# Altium PCB DT10966_MOTOR_CONTROLLER.PcbDoc (part 1 of 8)
Units mm, origin at the board's own origin, x right, y up, seen from the top; angles counter-clockwise.
Board outline 300 x 19 mm, 10 copper layers (Top Layer, Layer 2 GND, Layer 3 SIG, Layer 4 GND, Layer 5 PWR, Layer 6 PWR, Layer 7 GND, Layer 8 SIG, Layer 9 GND, Bottom Layer), stack 2.418 mm thick; 745 components, 446 nets, 2132 pads, 1222 vias.
Unrouted connection lines stored in the file: 3.
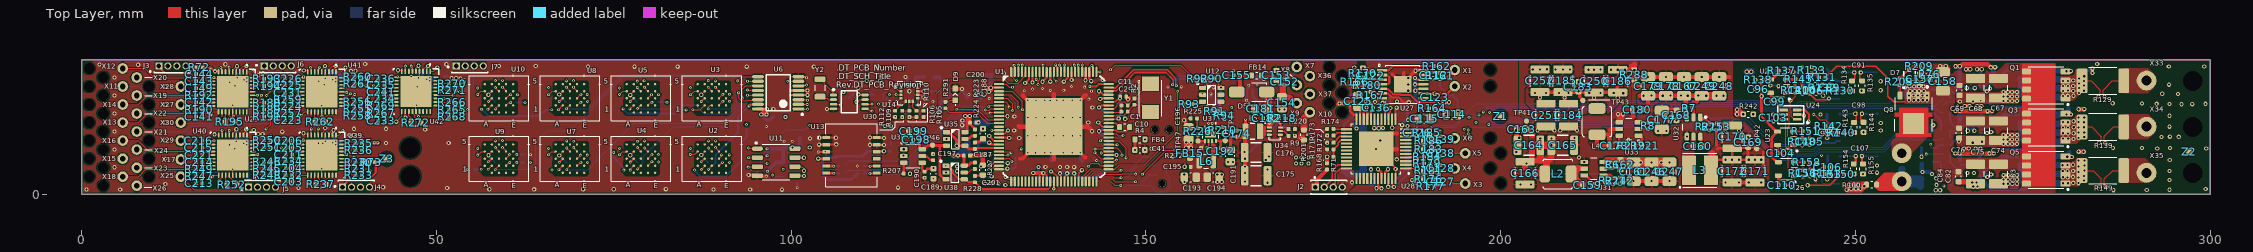
[diagram p0: Top Layer view]
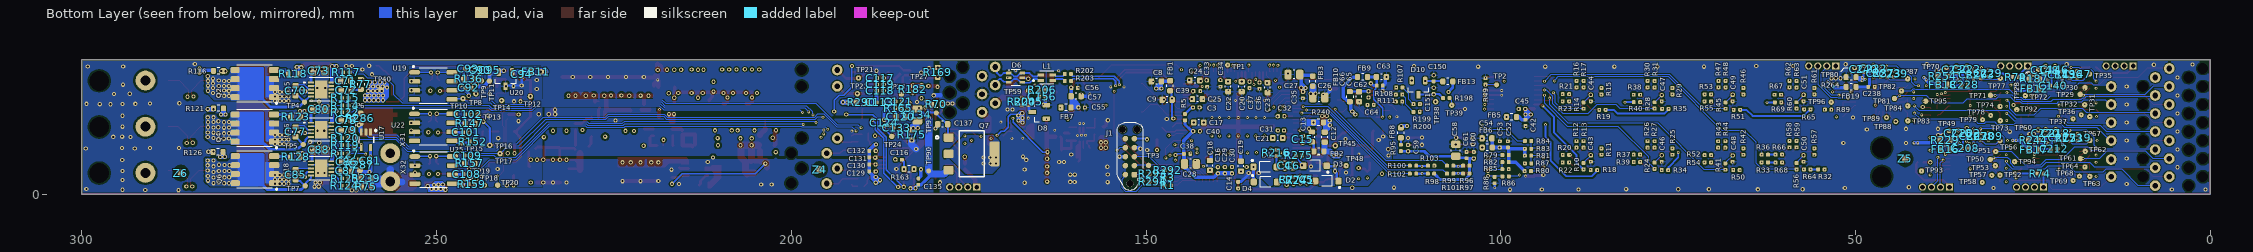
[diagram p1: Bottom Layer view, seen from below]
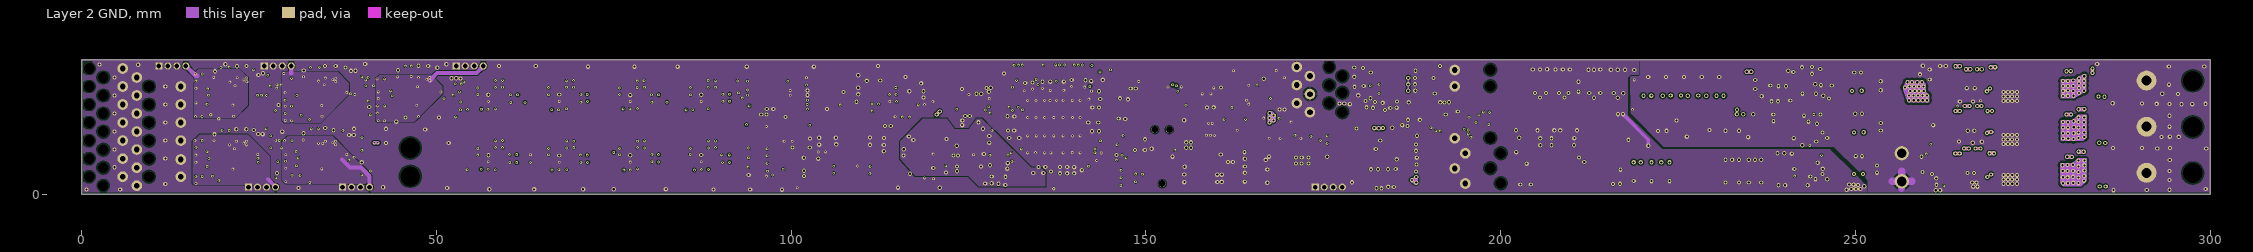
[diagram p2: Layer 2 GND]
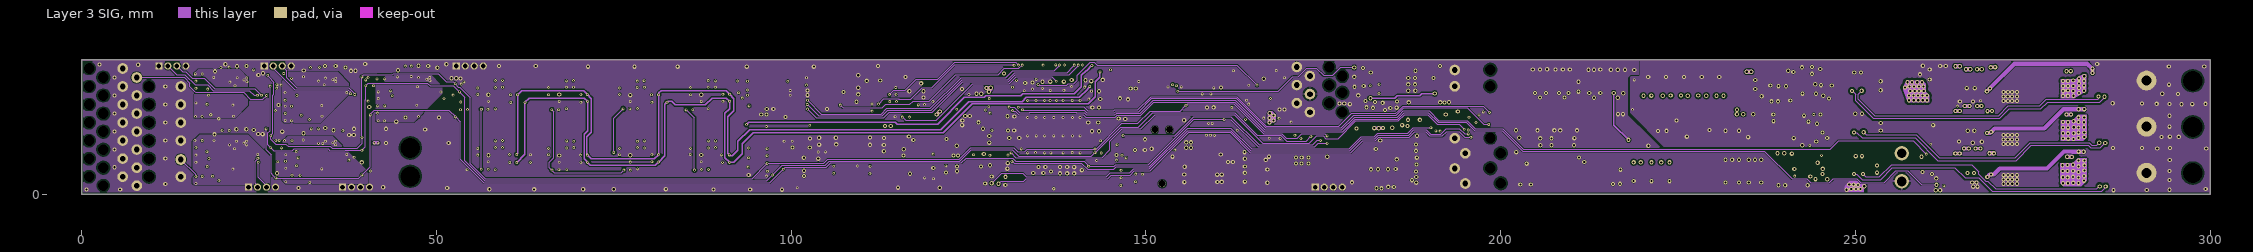
[diagram p3: Layer 3 SIG]
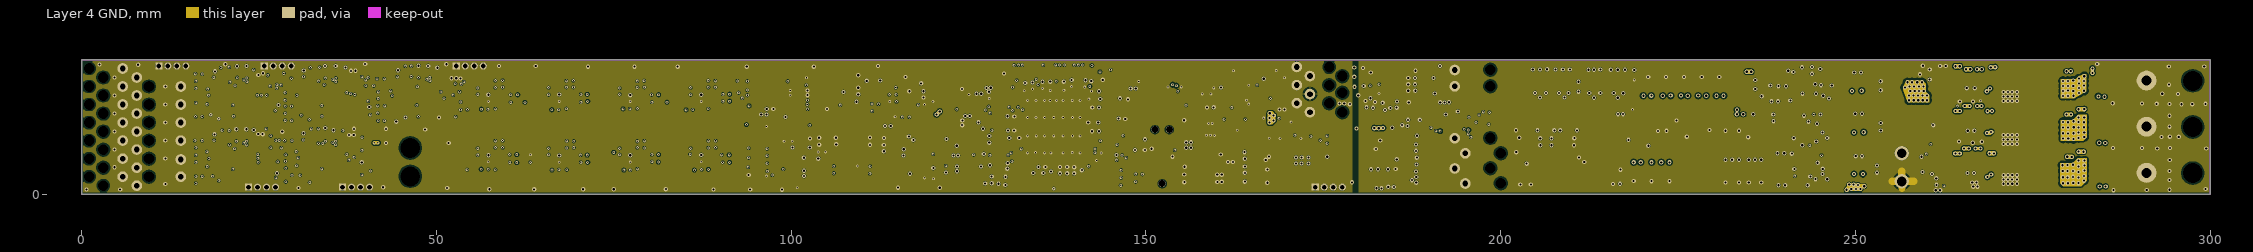
[diagram p4: Layer 4 GND]
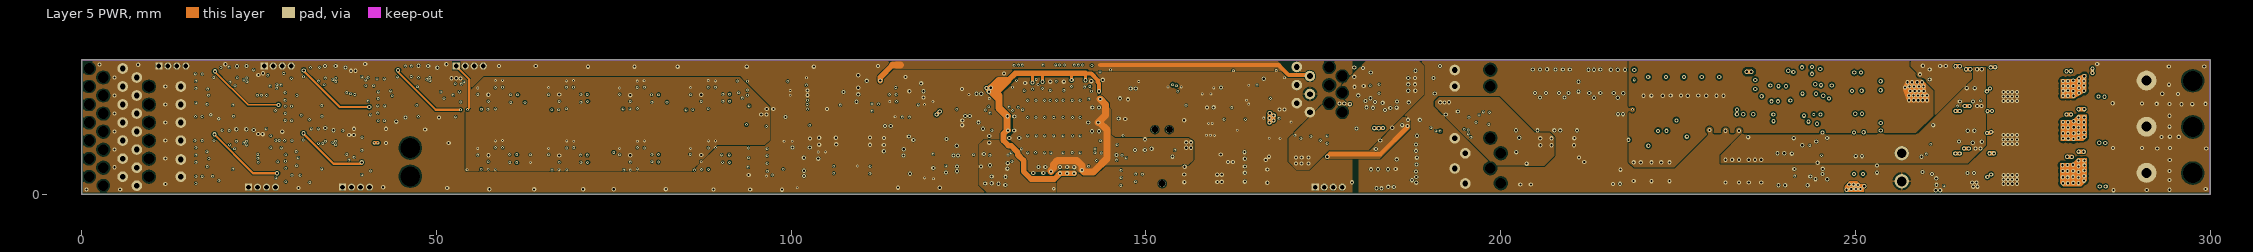
[diagram p5: Layer 5 PWR]
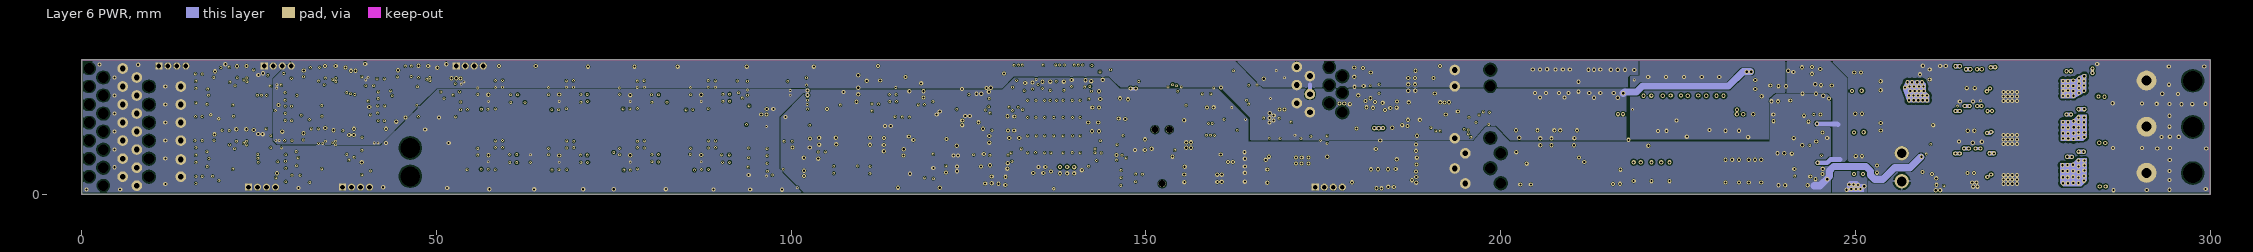
[diagram p6: Layer 6 PWR]
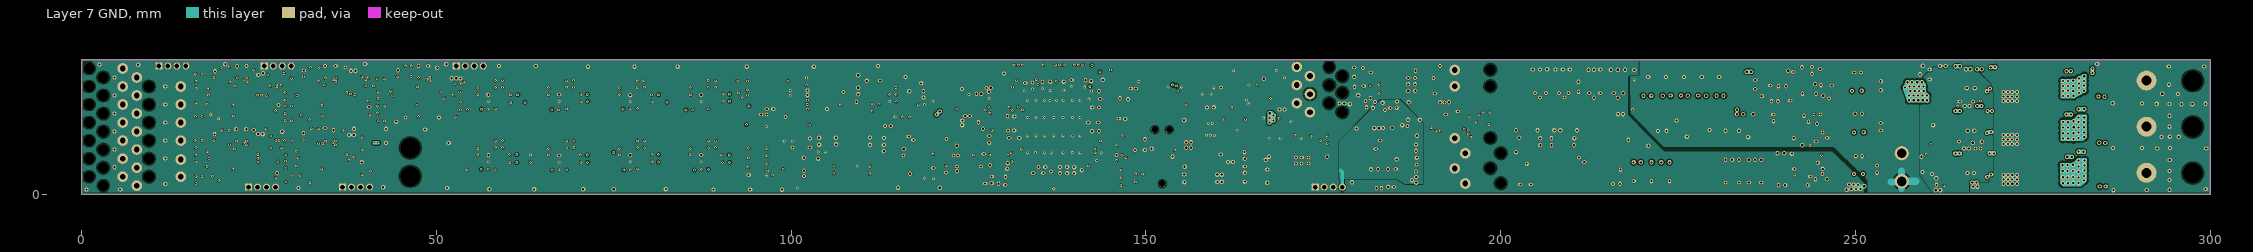
[diagram p7: Layer 7 GND]
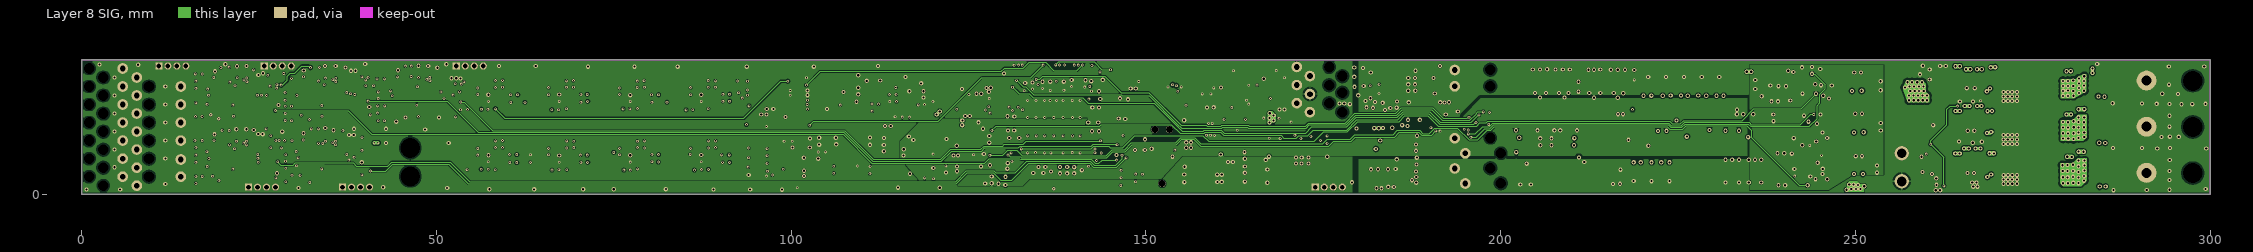
[diagram p8: Layer 8 SIG]
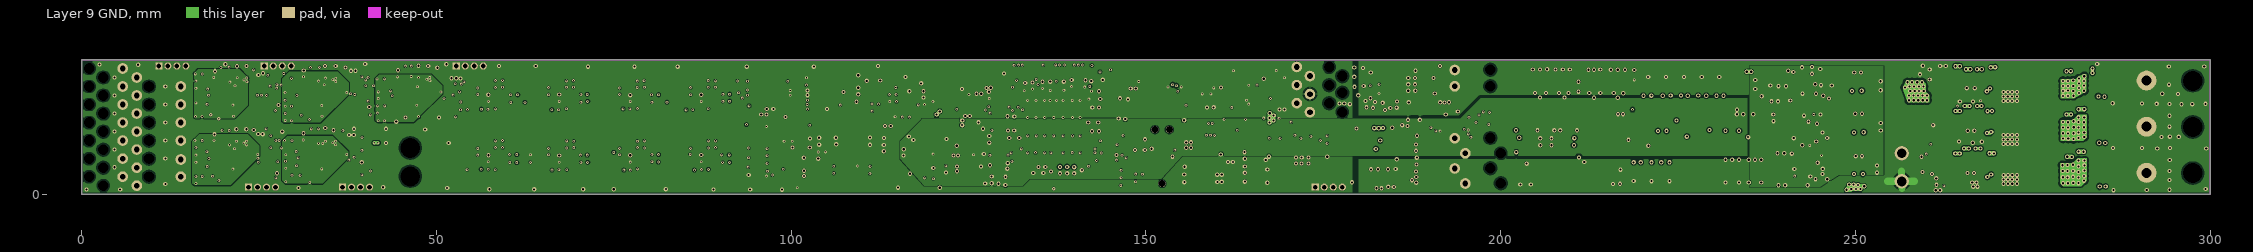
[diagram p9: Layer 9 GND]
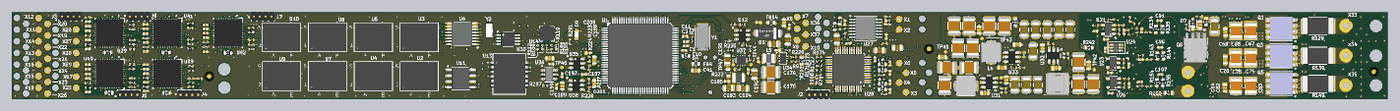
[diagram p16: 3D render of the assembled board from above, using the file's embedded part models]
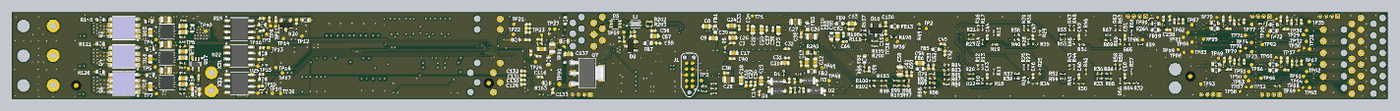
[diagram p17: 3D render of the assembled board from below, using the file's embedded part models]

## Layer stack, top to bottom
Top Solder: solder mask 0.0152, Solder Resist, Dk 3.5
Top Layer: signal copper 0.0457
Dielectric 1: prepreg 0.1524, P25-1080 (2x), Dk 3.76
Layer 2 GND: signal copper 0.0305
Dielectric 2: core 0.3302, P95, Dk 3.76
Layer 3 SIG: signal copper 0.0305
Dielectric 3: prepreg 0.1524, P25-1080 (2x), Dk 3.76
Layer 4 GND: signal copper 0.0305
Dielectric 4: core 0.3302, P95, Dk 3.76
Layer 5 PWR: signal copper 0.0305
Dielectric 5: prepreg 0.152, P25-1080 (2x), Dk 3.76
Layer 6 PWR: signal copper 0.0305
Dielectric 6: core 0.3302, P95, Dk 3.76
Layer 7 GND: signal copper 0.0305
Dielectric 7: prepreg 0.1524, P25-1080 (2x), Dk 3.76
Layer 8 SIG: signal copper 0.0305
Dielectric 8: core 0.3302, P95, Dk 3.76
Layer 9 GND: signal copper 0.0305
Dielectric 9: prepreg 0.1524, P25-1080 (2x), Dk 3.76
Bottom Layer: signal copper 0.0457
Bottom Solder: solder mask 0.0152, Solder Resist, Dk 3.5

## Board outline
0,0 300,0 300,19 0,19

## Design rules (kind name [scope] priority, off if disabled: settings)
Clearance "Clearance_power_GND GNDA" [InNet('GND') vs InNet('AGND')] p1: gap=0.3 ignorepadtopadclearanceinfootprint=FALSE except(0.5: Fill-Fill Fill-Poly Fill-Region Poly-Poly Poly-Region Region-Region)
Clearance Clearance_fid [InComponent('Z1')  or InComponent('Z2')   or InComponent('Z3')  or InComponent('Z4') or InComponent('Z5')  or InComponent('Z6') vs InPolygon] p2: gap=0.65 ignorepadtopadclearanceinfootprint=FALSE
Clearance Clearanceholes [InPadClass('Holes') vs InPolygon] p3: gap=0.23 ignorepadtopadclearanceinfootprint=FALSE
Clearance Clearanceholes_flash [InNetClass('FLASH') vs InPolygon] p4: gap=0.23 ignorepadtopadclearanceinfootprint=FALSE
Clearance Clearanceholes_USB [InNetClass('USB') vs InPolygon] p5: gap=0.3 ignorepadtopadclearanceinfootprint=FALSE
Clearance Clearanceholes_power [InNet('VIN') or   InNet('NetR129_2') or InNet('NetR139_2') or InNet('NetR149_2') vs InPolygon] p6: gap=0.3 ignorepadtopadclearanceinfootprint=FALSE
Clearance Clearance_power [InNetClass('power1')] p7: gap=0.21 ignorepadtopadclearanceinfootprint=FALSE except(0.139: SMDPad-SMDPad; 0.35: Via-Fill Via-Poly Via-Region)
Clearance Clearance_keepout [inpolygon vs IsKeepOut] p8: gap=0.254 ignorepadtopadclearanceinfootprint=FALSE
Clearance Clearance_VIAinPAD [IsVia vs IsPad] p9: gap=0 ignorepadtopadclearanceinfootprint=FALSE
Clearance [All] p10: gap=0.127 ignorepadtopadclearanceinfootprint=FALSE except(0.15: Arc-Fill Arc-Poly Arc-Region Track-Fill Track-Poly Track-Region SMDPad-Fill SMDPad-Poly SMDPad-Region THPad-Fill THPad-Poly THPad-Region Via-Fill Via-Poly Via-Region Fill-Fill Fill-Poly Fill-Region Poly-Poly Poly-Region Region-Region)
DiffPairsRouting USB [InDifferentialPair('USB_CON_D')   or  InDifferentialPair('USB_D')] p1: maxlimit=0.127 minlimit=0.127 mostfreqgap=0.127 toplayer_minwidth=0.25 toplayer_maxwidth=0.25 toplayer_prefwidth=0.25 midlayer1_minwidth=0.129 midlayer1_maxwidth=0.129 midlayer1_prefwidth=0.129 midlayer2_minwidth=0.129 midlayer2_maxwidth=0.129 midlayer2_prefwidth=0.129 midlayer3_minwidth=0.129 midlayer3_maxwidth=0.129 midlayer3_prefwidth=0.129 midlayer4_minwidth=0.129 midlayer4_maxwidth=0.129 midlayer4_prefwidth=0.129 midlayer5_minwidth=0.129 midlayer5_maxwidth=0.129 midlayer5_prefwidth=0.129 midlayer6_minwidth=0.129 midlayer6_maxwidth=0.129 midlayer6_prefwidth=0.129 midlayer7_minwidth=0.129 midlayer7_maxwidth=0.129 midlayer7_prefwidth=0.129 midlayer8_minwidth=0.129 midlayer8_maxwidth=0.129 midlayer8_prefwidth=0.129 bottomlayer_minwidth=0.25 bottomlayer_maxwidth=0.25 bottomlayer_prefwidth=0.25 impedanceprofiledriven=TRUE impedanceprofileid={A6BA1F2C-6027-474B-B4F8-4A1B8FBFF102} impedanceprofilevalue=90.000000 maxuncoupledlength=12.7
DiffPairsRouting [All] p2: maxlimit=0.254 minlimit=0.254 mostfreqgap=0.254 toplayer_minwidth=0.381 toplayer_maxwidth=0.381 toplayer_prefwidth=0.381 midlayer1_minwidth=0.381 midlayer1_maxwidth=0.381 midlayer1_prefwidth=0.381 midlayer2_minwidth=0.381 midlayer2_maxwidth=0.381 midlayer2_prefwidth=0.381 midlayer3_minwidth=0.381 midlayer3_maxwidth=0.381 midlayer3_prefwidth=0.381 midlayer4_minwidth=0.381 midlayer4_maxwidth=0.381 midlayer4_prefwidth=0.381 midlayer5_minwidth=0.381 midlayer5_maxwidth=0.381 midlayer5_prefwidth=0.381 midlayer6_minwidth=0.381 midlayer6_maxwidth=0.381 midlayer6_prefwidth=0.381 midlayer7_minwidth=0.381 midlayer7_maxwidth=0.381 midlayer7_prefwidth=0.381 midlayer8_minwidth=0.381 midlayer8_maxwidth=0.381 midlayer8_prefwidth=0.381 bottomlayer_minwidth=0.381 bottomlayer_maxwidth=0.381 bottomlayer_prefwidth=0.381 maxuncoupledlength=12.7
HoleSize [All] p1: absolutevalues=TRUE maxlimit=10 minlimit=0.025 maxpercent=80.000 minpercent=20.000
MinimumSolderMaskSliver [All] p1: minsoldermaskwidth=0.127
PasteMaskExpansion [All] p1: expansion=-0.05
PolygonConnect PolygonConnect_1 [All vs IsNamedPolygon('NETC160_1')  or    IsNamedPolygon('+12V0_1') or IsNamedPolygon('VPWR1_1') or IsNamedPolygon('GND_1')  or   IsNamedPolygon('GND_2')   or    IsNamedPolygon('GND_4')  or    IsNamedPolygon('PGND_4') or    IsNamedPolygon('GND_11') or IsNamedPolygon('GND_12') or IsNamedPolygon('GND_13')   or IsNamedPolygon('NETC193')] p1: connectstyle=Direct reliefconductorwidth=0.254 reliefentries=4 polygonreliefangle="90 Angle" airgapwidth=0.254
PolygonConnect direct [InNetClass('power1')] p2: connectstyle=Direct reliefconductorwidth=0.254 reliefentries=4 polygonreliefangle="90 Angle" airgapwidth=0.254
PolygonConnect [All] p3: thpad.connectstyle=Relief thpad.reliefconductorwidth=0.254 thpad.reliefentries=4 thpad.polygonreliefangle="90 Angle" thpad.airgapwidth=0.254 smdpad.connectstyle=Relief smdpad.reliefconductorwidth=0.254 smdpad.reliefentries=4 smdpad.polygonreliefangle="90 Angle" smdpad.airgapwidth=0.254 via.connectstyle=Direct via.reliefconductorwidth=0.254 via.reliefentries=4 via.polygonreliefangle="90 Angle" via.airgapwidth=0.254
RoutingVias [All] p1: holewidth=0.711 width=1.27 viastyle="Through Hole" minholewidth=0 minwidth=0 maxholewidth=0.711 maxwidth=1.27
SilkToSilkClearance [All] p1: silktosilkclearance=0.1
SilkToSolderMaskClearance [IsPad] p1: minsilkscreentomaskgap=0.127 clearancetoexposedcopper=TRUE
SolderMaskExpansion [All] p1: expansion=0.102 istentingtop=FALSE
Width Width_flash [InNetClass('FLASH')] p1: maxlimit=0.3 minlimit=0.15 preferedwidth=0.18 toplayer_prefwidth=0.27 midlayer1_maxwidth=0.2 midlayer2_maxwidth=0.2 midlayer3_maxwidth=0.2 midlayer3_prefwidth=0.179 midlayer4_maxwidth=0.2 midlayer4_prefwidth=0.179 midlayer5_maxwidth=0.2 midlayer6_maxwidth=0.2 midlayer7_maxwidth=0.2 midlayer8_maxwidth=0.2 bottomlayer_minwidth=0.27 bottomlayer_prefwidth=0.27 impedanceprofiledriven=TRUE impedanceprofileid={D925CE3F-F9EE-4F76-85FA-062D785EDE73} impedanceprofilevalue=50.000000 minimp=50.000000 maximp=50.000000 favimp=50.000000
Width [All] p2: maxlimit=3 minlimit=0.127 preferedwidth=0.254
24 further rules are at their usual default settings.

## Classes and differential pairs
pad class Holes: Free-2 Free-3
net class power1: NetC70_1 NetC77_1 NetC85_1 NetR129_2 NetR139_2 NetR149_2 VBAT VIN
net class FLASH: SPI_C_CLK SPI_C_MISO SPI_C_MOSI SPI_FLASH1_CS
net class USB: NetL1_2 NetL1_3 USB_CON_D_N USB_CON_D_P USB_D_N USB_D_P
component class USB: C152 C153 C154 C155 C156 D5 D6 D8 FB14 L1 R201 R202 R203 R204 R205 R206 TP59
component class Temp_Sensor: C55 C56 C57 FB7 R90 R91 R92 R93 R94 U12
component class Resolver: C112 C113 C114 C115 C116 C117 C118 C119 C120 C121 C122 C123 C124 C125 C126 C127 C128 C129 C130 C131 C132 C133 C134 C135 C136 C137 C138 C139 J2 Q7 R71 R161 R162 R163 R164 R165 R166 R167 R168 R169 R170 R171 R172 R173 R174 R175 R176 R177 R179 R180 R181 R182 R183 R184 R185 R186 R290 TP21 TP22 TP23 TP24 TP27 TP90 TP91 U27 U28
component class PS5: C232 C233 C234 C235 C236 C237 C238 C239 C240 C241 FB19 J7 R89 R264 R265 R266 R267 R268 R269 R270 R271 R272 R273 TP80 TP81 TP82 TP83 TP84 TP87 TP88 TP89 TP96 U42
component class PS4: C202 C203 C204 C205 C206 C207 C208 C209 C210 C211 FB16 J4 R73 R229 R230 R231 R232 R233 R234 R235 R236 R237 R238 TP49 TP50 TP51 TP52 TP53 TP56 TP57 TP58 TP93 U39
component class PS3: C222 C223 C224 C225 C226 C227 C228 C229 C230 C231 FB18 J6 R78 R254 R255 R256 R257 R258 R259 R260 R261 R262 R263 TP70 TP71 TP72 TP73 TP74 TP77 TP78 TP79 TP95 U41
component class PS2: C212 C213 C214 C215 C216 C217 C218 C219 C220 C221 FB17 J5 R74 R244 R245 R246 R247 R248 R249 R250 R251 R252 R253 TP60 TP61 TP62 TP63 TP64 TP67 TP68 TP69 TP94 U40
component class PS1: C140 C141 C142 C143 C144 C145 C146 C147 C148 C149 FB12 J3 R72 R187 R188 R189 R190 R191 R192 R193 R194 R195 R196 TP28 TP29 TP30 TP31 TP32 TP35 TP36 TP37 TP92 U29
component class POWER: C157 C158 C159 C160 C161 C162 C163 C164 C165 C166 C167 C168 C169 C170 C171 C172 C173 C174 C175 C176 C177 C178 C179 C180 C181 C182 C183 C184 C185 C186 C187 C188 C189 C190 C191 C192 C193 C194 C195 C196 C197 C198 C199 C200 C201 C246 C247 C248 C249 C250 C251 C252 D7 FB15 L2 L3 L4 L5 L6 Q8 R6 R7 R8 R9 R207 R208 R209 R210 R212 R213 R214 R215 R218 R219 R220 R221 R222 R223 R224 R225 R226 R227 R228 TP40 TP41 TP42 TP43 TP44 TP45 TP46 TP47 TP48 U31 U32 U33 U34 U35 U36 U37 U38
component class "Phase Current/Voltage Sense": C89 C90 C91 C92 C93 C94 C95 C96 C97 C98 C99 C100 C101 C102 C103 C104 C105 C106 C107 C108 C109 C110 C111 FB11 R129 R130 R131 R132 R133 R134 R135 R136 R137 R138 R139 R140 R141 R142 R143 R144 R145 R146 R147 R148 R149 R150 R151 R152 R153 R154 R155 R156 R157 R158 R159 R242 TP8 TP9 TP10 TP11 TP12 TP13 TP14 TP15 TP16 TP17 TP18 TP19 TP20 U19 U20 U21 U22 U23 U24 U25 U26
component class MCU: C1 C2 C3 C8 C9 C10 C11 C12 C13 C14 C15 C16 C17 C18 C19 C20 C21 C22 C23 C24 C25 C26 C27 C28 C29 C30 C31 C32 C33 C34 C35 C36 C37 C38 C39 C40 D9 FB1 FB2 FB3 R1 R2 R3 R4 R5 R240 R291 R292 R293 R294 TP1 TP2 TP3 U1 Y1
component class Main: R70 R160 R288 X1 X2 X3 X4 X5 X6 X7 X8 X9 X10 X11 X12 X13 X14 X15 X16 X17 X18 X19 X20 X21 X22 X23 X24 X25 X26 X27 X28 X29 X30 X31 X32 X33 X34 X35 X36 X37 Z1 Z2 Z3 Z4 Z5 Z6
component class H-Bridge: C67 C68 C69 C70 C71 C72 C73 C74 C75 C76 C77 C78 C79 C80 C81 C82 C83 C84 C85 C86 C87 C88 Q1 Q2 Q3 Q4 Q5 Q6 R75 R76 R77 R114 R115 R116 R117 R118 R119 R120 R121 R122 R123 R124 R125 R126 R127 R128 R239 R286 R287 TP4 TP5 TP6 TP7 U15 U16 U17 U18
component class FLASH: C42 C43 C44 C45 C46 C47 C48 C49 C50 C51 FB5 R10 R11 R12 R13 R14 R15 R16 R17 R18 R19 R20 R21 R22 R23 R24 R25 R26 R27 R28 R29 R30 R31 R32 R33 R34 R35 R36 R37 R38 R39 R40 R41 R42 R43 R44 R45 R46 R47 R48 R49 R50 R51 R52 R53 R54 R55 R56 R57 R58 R59 R60 R61 R62 R63 R64 R65 R66 R67 R68 R69 U2 U3 U4 U5 U6 U7 U8 U9 U10
component class EEPROM: C52 C53 C54 FB6 R79 R80 R81 R82 R83 R84 R85 R86 R87 R88 U11
component class DEBUG: C41 FB4 J1
component class Calendar: C150 C151 D10 FB13 R198 R199 R200 TP38 TP39 U30 Y2
component class AMP: C4 C5 C6 C7 D1 D2 D3 D4 R216 R241 R275 R277
component class ACCELEROMETERS: C58 C59 C60 C61 C62 C63 C64 C65 C66 FB8 FB9 FB10 R95 R96 R97 R98 R99 R100 R101 R102 R103 R105 R106 R107 R108 R109 R110 R111 R112 U13 U14
differential pair USB_D: +USB_D_P -USB_D_N
differential pair USB_CON_D: +USB_CON_D_P -USB_CON_D_N

## Components (designator, comment, footprint, x,y, rotation, side; value= is the part's Value field where it differs from the comment)
C1 "C0402C120J5HACAUTO" CAPC100x50x50L25 146.978,11.645 r180 top
C2 "C0402C120J5HACAUTO" CAPC100x50x50L25 146.985,12.552 r180 top
C3 "GCM155L8EH104KE07D" CAPC100x50x50L25 142.937,12.253 r0 bottom
C4 "CGA2B2X8R1H222K050BA" CAPC100x50x50L25 130.464,4.062 r270 bottom
C5 "CGA2B2X8R1H222K050BA" CAPC100x50x50L25 127.334,2.027 r90 bottom
C6 "CGA2B2X8R1H222K050BA" CAPC100x50x50L25 129.286,4.037 r270 bottom
C7 "CGA2B2X8R1H222K050BA" CAPC100x50x50L25 130.2,2.029 r90 bottom
C8 "C1608X8L0J225K080AC" CAPC160X80X90L35 148.529,15.912 r180 bottom
C9 "C1608X8L0J225K080AC" CAPC160X80X90L35 147.021,13.322 r180 bottom
C10 "GCM155L8EH104KE07D" CAPC100x50x50L25 146.587,10.679 r180 top
C11 "GCM155L8EH104KE07D" CAPC100x50x50L25 146.79,13.77 r180 top
C12 "C1608X8L0J225K080AC" CAPC160X80X90L35 124.814,8.06 r270 bottom
C13 "C1608X8L0J225K080AC" CAPC160X80X90L35 126.637,8.087 r270 bottom
C14 "GCM155L8EH104KE07D" CAPC100x50x50L25 137.011,1.307 r270 bottom
C15 "GCM155L8EH104KE07D" CAPC100x50x50L25 127.905,7.791 r270 bottom
C16 "GCM155L8EH104KE07D" CAPC100x50x50L25 139.873,3.399 r270 bottom
C17 "C1608X8L0J225K080AC" CAPC160X80X90L35 142.566,10.115 r0 bottom
C18 "C1608X8L0J225K080AC" CAPC160X80X90L35 140.987,4.071 r270 bottom
C19 "C1608X8L0J225K080AC" CAPC160X80X90L35 136.617,3.989 r270 bottom
C20 "C1608X8L0J225K080AC" CAPC160X80X90L35 136.511,15.182 r90 bottom
C21 "C1608X8L0J225K080AC" CAPC160X80X90L35 131.435,7.931 r180 bottom
C22 "C1608X8L0J225K080AC" CAPC160X80X90L35 138.423,15.181 r90 bottom
C23 "C1608X8L0J225K080AC" CAPC160X80X90L35 132.861,15.047 r90 bottom
C24 "C1608X8L0J225K080AC" CAPC160X80X90L35 143.113,16.052 r180 bottom
C25 "C1608X8L0J225K080AC" CAPC160X80X90L35 142.747,13.433 r0 bottom
C26 "CGA4J1X8L1A106K125AC" CAPC200X125X145L50 125.636,13.645 r0 bottom
C27 "CGA4J1X8L1A106K125AC" CAPC200X125X145L50 129.156,16.884 r180 bottom
C28 "CGA4J1X8L1A106K125AC" CAPC200X125X145L50 143.737,4.291 r0 bottom
C29 "GCM155L8EH104KE07D" CAPC100x50x50L25 138.886,3.407 r270 bottom
C30 "GCM155L8EH104KE07D" CAPC100x50x50L25 137.886,3.407 r270 bottom
C31 "GCM155L8EH104KE07D" CAPC100x50x50L25 130.985,9.016 r180 bottom
C32 "GCM155L8EH104KE07D" CAPC100x50x50L25 130.955,11.017 r180 bottom
C33 "GCM155L8EH104KE07D" CAPC100x50x50L25 141.377,15.616 r90 bottom
C34 "GCM155L8EH104KE07D" CAPC100x50x50L25 139.519,15.622 r90 bottom
C35 "GCM155L8EH104KE07D" CAPC100x50x50L25 127.905,13.998 r90 bottom
C36 "GCM155L8EH104KE07D" CAPC100x50x50L25 134.011,15.326 r90 bottom
C37 "GCM155L8EH104KE07D" CAPC100x50x50L25 135.396,15.437 r90 bottom
C38 "GCM155L8EH104KE07D" CAPC100x50x50L25 144.215,5.709 r0 bottom
C39 "GCM155L8EH104KE07D" CAPC100x50x50L25 142.816,14.537 r0 bottom
C40 "GCM155L8EH104KE07D" CAPC100x50x50L25 142.878,8.896 r0 bottom
C41 "C1608X8L0J225K080AC" CAPC160X80X90L35 149.138,6.255 r180 top
C42 "GCM155L8EH104KE07D" CAPC100x50x50L25 96.516,10.073 r90 bottom
C43 "GCM155L8EH104KE07D" CAPC100x50x50L25 87.321,5.037 r90 bottom
C44 "GCM155L8EH104KE07D" CAPC100x50x50L25 87.321,13.537 r90 bottom
C45 "GCM155L8EH104KE07D" CAPC100x50x50L25 96.991,12.037 r180 bottom
C46 "GCM155L8EH104KE07D" CAPC100x50x50L25 77.321,5.053 r90 bottom
C47 "GCM155L8EH104KE07D" CAPC100x50x50L25 77.321,13.537 r90 bottom
C48 "GCM155L8EH104KE07D" CAPC100x50x50L25 67.321,5.037 r90 bottom
C49 "GCM155L8EH104KE07D" CAPC100x50x50L25 67.321,13.537 r90 bottom
C50 "GCM155L8EH104KE07D" CAPC100x50x50L25 57.321,5.037 r90 bottom
C51 "GCM155L8EH104KE07D" CAPC100x50x50L25 57.321,13.537 r90 bottom
C52 "GCM155L8EH104KE07D" CAPC100x50x50L25 99.005,7.045 r270 bottom
C53 "GCM155L8EH104KE07D" CAPC100x50x50L25 100.14,7.041 r270 bottom
C54 "GCG188L8EE105KA07D" CAPC160X80X90L35 101.948,7.897 r180 bottom
C55 "GCM155L8EH104KE07D" CAPC100x50x50L25 159.061,12.233 r0 bottom
C56 "GCM155L8EH104KE07D" CAPC100x50x50L25 160.054,14.998 r0 bottom
C57 "GCG188L8EE105KA07D" CAPC160X80X90L35 159.849,13.835 r0 bottom
C58 "CGA4J1X8L1A106K125AC" CAPC200X125X145L50 106.347,6.208 r270 bottom
C59 "GCM155L8EH104KE07D" CAPC100x50x50L25 113.061,6.509 r270 bottom
C60 "GCM155L8EH104KE07D" CAPC100x50x50L25 103.81,5.534 r270 bottom
C61 "GCM155L8EH104KE07D" CAPC100x50x50L25 104.821,5.537 r270 bottom
C62 "GCM155L8EH104KE07D" CAPC100x50x50L25 117.059,15.314 r0 bottom
C63 "GCG188L8EE105KA07D" CAPC160X80X90L35 116.821,16.537 r0 bottom
C64 "GCM155L8EH104KE07D" CAPC100x50x50L25 118.341,12.612 r180 bottom
C65 "GCM155L8EH104KE07D" CAPC100x50x50L25 118.651,14.087 r90 bottom
C66 "GCG188L8EE105KA07D" CAPC160X80X90L35 119.967,13.769 r90 bottom
C67 "CL32E475KCIVPJE" CAPC320X250X250L60 270.119,14.967 r90 top
C68 "CL32E475KCIVPJE" CAPC320X250X250L60 266.905,14.967 r90 top
C69 "GCJ188L8EL104KA07D" CAPC160X80X90L35 264.633,14.644 r90 top
C70 "GCJ188L8EL104KA07D" CAPC160X80X90L35 269.827,14.61 r90 bottom
C71 "C0603C101K8HACAUTO" CAPC160X80X90L35 262.742,16.007 r0 bottom
C72 "C0603C101K8HACAUTO" CAPC160X80X90L35 262.708,14.67 r0 bottom
C73 "CGA4J1X8L1E475K125AC" CAPC200X125X145L50 266.546,17.404 r0 bottom
C74 "CL32E475KCIVPJE" CAPC320X250X250L60 270.119,8.97 r90 top
C75 "CL32E475KCIVPJE" CAPC320X250X250L60 266.877,8.967 r90 top
C76 "GCJ188L8EL104KA07D" CAPC160X80X90L35 264.579,8.633 r90 top
C77 "GCJ188L8EL104KA07D" CAPC160X80X90L35 269.827,8.794 r90 bottom
C78 "C0603C101K8HACAUTO" CAPC160X80X90L35 262.718,10.442 r0 bottom
C79 "C0603C101K8HACAUTO" CAPC160X80X90L35 262.708,9.06 r0 bottom
C80 "CGA4J1X8L1E475K125AC" CAPC200X125X145L50 266.54,12.003 r0 bottom
C81 "GCM155L8EH104KE07D" CAPC100x50x50L25 259.308,4.772 r90 bottom
C82 "CL32E475KCIVPJE" CAPC320X250X250L60 266.905,2.87 r90 top
C83 "CL32E475KCIVPJE" CAPC320X250X250L60 270.119,2.87 r90 top
C84 "GCJ188L8EL104KA07D" CAPC160X80X90L35 264.513,2.492 r90 top
C85 "GCJ188L8EL104KA07D" CAPC160X80X90L35 269.827,2.782 r90 bottom
C86 "C0603C101K8HACAUTO" CAPC160X80X90L35 262.661,4.58 r0 bottom
C87 "C0603C101K8HACAUTO" CAPC160X80X90L35 262.708,3.309 r0 bottom
C88 "CGA4J1X8L1E475K125AC" CAPC200X125X145L50 266.55,6.304 r0 bottom
C89 "GCM155L8EH333KE07D" CAPC100x50x50L25 246.352,15.034 r270 top
C90 "GCM155L8EH333KE07D" CAPC100x50x50L25 243.836,17.483 r270 bottom
C91 "C0402C152F4HACAUTO" CAPC100x50x50L25 250.247,17.172 r180 top
C92 "GCM155L8EH104KE07D" CAPC100x50x50L25 245.457,15.009 r0 bottom
C93 "GCM155L8EH104KE07D" CAPC100x50x50L25 245.512,17.676 r0 bottom
C94 "GCM155L8EH104KE07D" CAPC100x50x50L25 237.941,16.923 r90 bottom
C95 "GCM155L8EH104KE07D" CAPC100x50x50L25 242.499,17.473 r270 bottom
C96 "CGA2B2X8R1H222K050BA" CAPC100x50x50L25 236.294,14.837 r0 top
C97 "GCM155L8EH333KE07D" CAPC100x50x50L25 246.183,8.667 r0 top
C98 "C0402C152F4HACAUTO" CAPC100x50x50L25 250.446,11.366 r180 top
C99 "GCM155L8EH104KE07D" CAPC100x50x50L25 238.609,13.058 r180 top
C100 "CGA2B2X8R1H222K050BA" CAPC100x50x50L25 242.528,14.693 r90 top
C101 "GCM155L8EH104KE07D" CAPC100x50x50L25 245.772,8.731 r0 bottom
C102 "GCM155L8EH104KE07D" CAPC100x50x50L25 245.496,11.269 r0 bottom
C103 "GCM155L8EH104KE07D" CAPC100x50x50L25 238.402,10.799 r90 top
C104 "GCM155L8EH104KE07D" CAPC100x50x50L25 239.436,5.786 r180 top
C105 "CGA2B2X8R1H222K050BA" CAPC100x50x50L25 243.529,7.403 r90 top
C106 "GCM155L8EH333KE07D" CAPC100x50x50L25 246.035,3.841 r0 top
C107 "C0402C152F4HACAUTO" CAPC100x50x50L25 250.449,5.382 r180 top
C108 "GCM155L8EH104KE07D" CAPC100x50x50L25 245.714,2.866 r0 bottom
C109 "GCM155L8EH104KE07D" CAPC100x50x50L25 245.603,5.475 r0 bottom
C110 "GCM155L8EH104KE07D" CAPC100x50x50L25 239.566,1.289 r180 top
C111 "CGA2B2X8R1H222K050BA" CAPC100x50x50L25 243.62,3.025 r90 top
C112 "DNP chip cap 0402" CAPC100x50x50L25 190.517,16.762 r90 top
C113 "GCM155L8EH104KE07D" CAPC100x50x50L25 187.534,12.967 r0 bottom
C114 "CGA4J1X8L1H474K125AC" CAPC200X125X145L50 193.112,11.256 r180 top
C115 "CGA4J1X8L1H474K125AC" CAPC200X125X145L50 189.216,10.64 r180 top
C116 "GCM155L8EH333KE07D" CAPC100x50x50L25 184.834,4.878 r180 bottom
C117 "GCM155L8EH104KE07D" CAPC100x50x50L25 187.461,16.392 r0 bottom
C118 "GCM155L8EH104KE07D" CAPC100x50x50L25 187.458,14.6 r0 bottom
C119 "GCM155L8EH104KE07D" CAPC100x50x50L25 187.461,15.5 r0 bottom
C120 "C0603C331J4HACTU" CAPC160X80X90L35 184.531,10.943 r0 bottom
C121 "GCM155L8EH104KE07D" CAPC100x50x50L25 184.864,13.084 r180 bottom
C122 "DNP chip cap 0402" CAPC100x50x50L25 181.67,16.741 r90 top
C123 "DNP chip cap 0402" CAPC100x50x50L25 190.707,13.696 r270 top
C124 "GCM155L8EH104KE07D" CAPC100x50x50L25 186.856,10.09 r270 bottom
C125 "CGA4J1X8L1H474K125AC" CAPC200X125X145L50 179.884,13.099 r90 top
C126 "GCM155L8EH104KE07D" CAPC100x50x50L25 188.198,8.697 r90 top
C127 "CGA2B3X8R1C473K050BB" CAPC100x50x50L25 191.509,1.778 r90 top
C128 "CGA2B3X8R1C473K050BB" CAPC100x50x50L25 191.509,3.705 r270 top
C129 "DNP chip cap 0402" CAPC100x50x50L25 188.556,3.239 r180 bottom
C130 "DNP chip cap 0402" CAPC100x50x50L25 188.548,4.222 r180 bottom
C131 "DNP chip cap 0402" CAPC100x50x50L25 188.546,5.216 r180 bottom
C132 "DNP chip cap 0402" CAPC100x50x50L25 188.552,6.133 r180 bottom
C133 "GCM155L8EH104KE07D" CAPC100x50x50L25 185.141,9.385 r180 bottom
C134 "CGA4J1X8L1H474K125AC" CAPC200X125X145L50 182.213,11.185 r270 bottom
C135 "GCM155L8EH104KE07D" CAPC100x50x50L25 182.092,1.795 r270 bottom
C136 "GCM155L8EH104KE07D" CAPC100x50x50L25 182.411,12.198 r180 top
C137 "C0603C331J4HACTU" CAPC160X80X90L35 178.649,9.89 r180 bottom
C138 "CGA2B3X8R1C473K050BB" CAPC100x50x50L25 191.513,5.794 r90 top
C139 "CGA2B3X8R1C473K050BB" CAPC100x50x50L25 191.54,7.779 r270 top
C140 "GCM155L8EH104KE07D" CAPC100x50x50L25 22.13,15.315 r0 bottom
C141 "GCM155L8EH104KE07D" CAPC100x50x50L25 16.56,10.958 r0 top
C142 "GCM155L8EH104KE07D" CAPC100x50x50L25 16.56,12.958 r0 top
C143 "C0402C561F4HACAUTO" CAPC100x50x50L25 16.56,15.958 r180 top
C144 "GCM155L8EH104KE07D" CAPC100x50x50L25 16.56,16.958 r0 top
C145 "GCM155L8EH104KE07D" CAPC100x50x50L25 20.903,16.887 r90 bottom
C146 "GCM155L8EH104KE07D" CAPC100x50x50L25 21.915,17.529 r90 bottom
C147 "GCM155L8EH104KE07D" CAPC100x50x50L25 18.801,16.897 r90 bottom
C148 "GCM155L8EH104KE07D" CAPC100x50x50L25 23.259,17.52 r90 bottom
C149 "GCM155L8EH104KE07D" CAPC100x50x50L25 16.56,14.958 r0 top
C150 "GCM155L8EH104KE07D" CAPC100x50x50L25 109.459,16.354 r270 bottom
C151 "GCM155L8EH104KE07D" CAPC100x50x50L25 109.459,14.582 r270 bottom
C152 "GCM155L8EH104KE07D" CAPC100x50x50L25 169.523,15.885 r270 top
C153 "GCG188L8EE105KA07D" CAPC160X80X90L35 168.372,16.755 r270 top
C154 "CGA4J1X8L1A106K125AC" CAPC200X125X145L50 169.157,12.924 r90 top
C155 "GCM155L8EH104KE07D" CAPC100x50x50L25 162.79,16.773 r0 top
C156 "GCM155L8EH104KE07D" CAPC100x50x50L25 164.616,13.766 r0 bottom
C157 "GCJ188L8EL104KA07D" CAPC160X80X90L35 259.074,16.21 r270 top
C158 "GCJ31CL8EL105KA07L" CAPC3216X180N 262.298,15.912 r270 top
C159 "GCJ188L8EL104KA07D" CAPC160X80X90L35 212.262,1.318 r0 top
C160 "GCJ188L8EL104KA07D" CAPC160X80X90L35 227.779,6.773 r0 top
C161 "GCJ31CL8EL105KA07L" CAPC3216X180N 218.715,3.191 r90 top
C162 "GCJ188L8EL104KA07D" CAPC160X80X90L35 216.85,4.183 r90 top
C163 "GCJ188L8EL104KA07D" CAPC160X80X90L35 202.933,9.196 r0 top
C164 "GCM32EL8EF226KE08L" CAPC3225_GCM32ER71E106KA57L 203.966,6.927 r0 top
C165 "GCM32EL8EF226KE08L" CAPC3225_GCM32ER71E106KA57L 208.726,6.926 r180 top
C166 "GCM32EL8EF226KE08L" CAPC3225_GCM32ER71E106KA57L 203.418,3 r90 top
C167 "GCJ31CL8EL105KA07L" CAPC3216X180N 225.805,15.219 r270 top
C168 "GCJ188L8EL104KA07D" CAPC160X80X90L35 224.74,11.125 r90 top
C169 "GCJ188L8EL104KA07D" CAPC160X80X90L35 234.849,7.366 r270 top
C170 "GCM32EL8EF226KE08L" CAPC3225_GCM32ER71E106KA57L 232.614,8.107 r270 top
C171 "GCM32EL8EF226KE08L" CAPC3225_GCM32ER71E106KA57L 235.827,3.274 r90 top
C172 "GCM32EL8EF226KE08L" CAPC3225_GCM32ER71E106KA57L 232.6,3.274 r90 top
C173 "GCJ188L8EL104KA07D" CAPC160X80X90L35 215.965,6.873 r0 top
C174 "GCM155L8EH104KE07D" CAPC100x50x50L25 162.793,8.558 r270 top
C175 "GCM32EL8EF226KE08L" CAPC3225_GCM32ER71E106KA57L 165.522,2.623 r180 top
C176 "GCM32EL8EF226KE08L" CAPC3225_GCM32ER71E106KA57L 165.504,5.898 r180 top
C177 "GCJ31CL8EL105KA07L" CAPC3216X180N 222.693,10.495 r90 top
C178 "GCJ31CL8EL105KA07L" CAPC3216X180N 223.272,15.219 r270 top
C179 "GCJ31CL8EL105KA07L" CAPC3216X180N 220.757,15.219 r270 top
C180 "GCJ188L8EL104KA07D" CAPC160X80X90L35 219.256,11.943 r0 top
C181 "CGA4J1X8L1A106K125AC" CAPC200X125X145L50 166.153,12.037 r0 top
C182 "GCM155L8EH104KE07D" CAPC100x50x50L25 166.977,10.703 r0 top
C183 "GCJ188L8EL104KA07D" CAPC160X80X90L35 210.933,15.177 r270 top
C184 "GCM32EL8EF226KE08L" CAPC3225_GCM32ER71E106KA57L 209.552,11.176 r90 top
C185 "GCM32EL8EF226KE08L" CAPC3225_GCM32ER71E106KA57L 208.738,16.011 r270 top
C186 "GCM32EL8EF226KE08L" CAPC3225_GCM32ER71E106KA57L 216.471,15.959 r270 top
C187 "GCM155L8EH104KE07D" CAPC100x50x50L25 124.752,5.453 r180 top
C188 "C1608X8L0J225K080AC" CAPC160X80X90L35 127.02,8.541 r270 top
C189 "C1608X8L0J225K080AC" CAPC160X80X90L35 120.035,2.91 r90 top
C190 "GCM155L8EH104KE07D" CAPC100x50x50L25 118.808,2.762 r90 top
C191 "CGA4J1X8L1A106K125AC" CAPC200X125X145L50 161.89,5.414 r90 top
C192 "GCM155L8EH104KE07D" CAPC100x50x50L25 160.542,6.064 r90 top
C193 "CGA4J1X8L1A106K125AC" CAPC200X125X145L50 156.244,2.41 r0 top
C194 "CGA4J1X8L1A106K125AC" CAPC200X125X145L50 159.478,2.425 r180 top
C195 "GCM155L8EH104KE07D" CAPC100x50x50L25 155.883,3.886 r0 top
C196 "CGA4J1X8L1A106K125AC" CAPC200X125X145L50 156.001,8.674 r270 top
C197 "DNP chip cap 0402" CAPC100x50x50L25 120.002,5.241 r270 top
C198 "GCM155L8EH104KE07D" CAPC100x50x50L25 117.658,7.668 r0 top
C199 "C1608X8L0J225K080AC" CAPC160X80X90L35 117.279,8.923 r0 top
C200 "GCM155L8EH104KE07D" CAPC100x50x50L25 125.647,10.096 r180 top
C201 "C1608X8L0J225K080AC" CAPC160X80X90L35 127,3.426 r270 top
C202 "GCM155L8EH104KE07D" CAPC100x50x50L25 34.338,8.648 r90 bottom
C203 "GCM155L8EH104KE07D" CAPC100x50x50L25 29.213,1.781 r0 top
C204 "GCM155L8EH104KE07D" CAPC100x50x50L25 29.213,3.69 r0 top
C205 "C0402C561F4HACAUTO" CAPC100x50x50L25 29.213,6.555 r180 top
C206 "GCM155L8EH104KE07D" CAPC100x50x50L25 29.213,7.555 r0 top
C207 "GCM155L8EH104KE07D" CAPC100x50x50L25 33.369,8.186 r90 bottom
C208 "GCM155L8EH104KE07D" CAPC100x50x50L25 34.525,6.49 r0 bottom
C209 "GCM155L8EH104KE07D" CAPC100x50x50L25 31.259,8.167 r90 bottom
C210 "GCM155L8EH104KE07D" CAPC100x50x50L25 35.573,8.638 r90 bottom
C211 "GCM155L8EH104KE07D" CAPC100x50x50L25 29.213,5.592 r0 top
C212 "GCM155L8EH104KE07D" CAPC100x50x50L25 22.001,6.417 r0 bottom
C213 "GCM155L8EH104KE07D" CAPC100x50x50L25 16.558,1.533 r0 top
C214 "GCM155L8EH104KE07D" CAPC100x50x50L25 16.558,4.533 r0 top
C215 "C0402C561F4HACAUTO" CAPC100x50x50L25 16.551,6.584 r180 top
C216 "GCM155L8EH104KE07D" CAPC100x50x50L25 16.551,7.584 r0 top
C217 "GCM155L8EH104KE07D" CAPC100x50x50L25 20.848,7.975 r90 bottom
C218 "GCM155L8EH104KE07D" CAPC100x50x50L25 21.826,8.617 r90 bottom
C219 "GCM155L8EH104KE07D" CAPC100x50x50L25 18.751,7.957 r90 bottom
C220 "GCM155L8EH104KE07D" CAPC100x50x50L25 23.237,8.617 r90 bottom
C221 "GCM155L8EH104KE07D" CAPC100x50x50L25 16.558,5.533 r0 top
C222 "GCM155L8EH104KE07D" CAPC100x50x50L25 34.32,17.598 r90 bottom
C223 "GCM155L8EH104KE07D" CAPC100x50x50L25 29.15,10.43 r0 top
C224 "GCM155L8EH104KE07D" CAPC100x50x50L25 29.153,12.412 r0 top
C225 "C0402C561F4HACAUTO" CAPC100x50x50L25 29.133,15.405 r180 top
C226 "GCM155L8EH104KE07D" CAPC100x50x50L25 29.123,16.321 r0 top
C227 "GCM155L8EH104KE07D" CAPC100x50x50L25 33.422,16.866 r90 bottom
C228 "GCM155L8EH104KE07D" CAPC100x50x50L25 34.65,15.438 r0 bottom
C229 "GCM155L8EH104KE07D" CAPC100x50x50L25 31.323,17.034 r90 bottom
C230 "GCM155L8EH104KE07D" CAPC100x50x50L25 35.816,17.582 r90 bottom
C231 "GCM155L8EH104KE07D" CAPC100x50x50L25 29.122,14.299 r0 top
C232 "GCM155L8EH104KE07D" CAPC100x50x50L25 47.488,17.668 r90 bottom
C233 "GCM155L8EH104KE07D" CAPC100x50x50L25 42.243,10.367 r0 top
C234 "GCM155L8EH104KE07D" CAPC100x50x50L25 42.243,13.488 r0 top
C235 "C0402C561F4HACAUTO" CAPC100x50x50L25 42.241,15.362 r180 top
C236 "GCM155L8EH104KE07D" CAPC100x50x50L25 42.23,16.275 r0 top
C237 "GCM155L8EH104KE07D" CAPC100x50x50L25 46.466,17.045 r90 bottom
C238 "GCM155L8EH104KE07D" CAPC100x50x50L25 47.769,15.157 r0 bottom
C239 "GCM155L8EH104KE07D" CAPC100x50x50L25 44.63,17.015 r90 bottom
C240 "GCM155L8EH104KE07D" CAPC100x50x50L25 48.87,17.666 r90 bottom
C241 "GCM155L8EH104KE07D" CAPC100x50x50L25 42.243,14.433 r0 top
C246 "GCJ31CL8EL105KA07L" CAPC3216X180N 221.25,3.186 r90 top
C247 "GCJ31CL8EL105KA07L" CAPC3216X180N 223.759,3.186 r90 top
C248 "GCJ31CL8EL105KA07L" CAPC3216X180N 230.771,15.219 r270 top
C249 "GCJ31CL8EL105KA07L" CAPC3216X180N 228.306,15.219 r270 top
C250 "GCM32EL8EF226KE08L" CAPC3225_GCM32ER71E106KA57L 213.138,15.959 r270 top
C251 "GCM32EL8EF226KE08L" CAPC3225_GCM32ER71E106KA57L 206.356,11.176 r90 top
C252 "GCM32EL8EF226KE08L" CAPC3225_GCM32ER71E106KA57L 205.516,16.011 r270 top
D1 "MBR0580S1-7" SOD365X155X135L30X57 133.216,3.872 r180 bottom
D2 "MBR0580S1-7" SOD365X155X135L30X57 124.517,1.878 r0 bottom
D3 "MBR0580S1-7" SOD365X155X135L30X57 126.179,4.026 r0 bottom
D4 "MBR0580S1-7" SOD365X155X135L30X57 133.179,1.74 r180 bottom
D5 "SS14-LTP" DIOM520X260X290XL115X145 164.89,14.425 r180 top
D6 "D5V0F4U6S-7" SOP6P65_200X210X90L85X20 168.372,16.44 r180 bottom
D7 "MM3Z10VST1G" SOD250X125X110L30X40 257.568,16.467 r90 top
D8 "BAT54S,215" SOT23-3P95_237X112L50X40 165.043,11.612 r0 bottom
D9 "APT1608SEC/J3-AMT" APT1608SECJ3AMT 123.137,14.087 r90 top
D10 "BAT54CTA" SOT23-3P95_237X112L50X40 111.605,15.035 r270 bottom
FB1 "BLM18KG221BH1D" BEADC160X80X95L40 146.601,15.311 r270 bottom
FB2 "BLM18KG221BH1D" BEADC160X80X95L40 125.647,6.057 r0 bottom
FB3 "BLM18KG221BH1D" BEADC160X80X95L40 126.496,15.945 r90 bottom
FB4 "BLM18KG221BH1D" BEADC160X80X95L40 149.138,7.755 r0 top
FB5 "BLM18KG221BH1D" BEADC160X80X95L40 98.497,10.901 r180 bottom
FB6 "BLM18KG221BH1D" BEADC160X80X95L40 101.909,6.604 r180 bottom
FB7 "BLM18KG221BH1D" BEADC160X80X95L40 161.28,12.233 r180 bottom
FB8 "BLM18KG221BH1D" BEADC160X80X95L40 114.092,8.68 r270 bottom
FB9 "BLM18KG221BH1D" BEADC160X80X95L40 119.479,16.537 r0 bottom
FB10 "BLM18KG221BH1D" BEADC160X80X95L40 121.275,13.764 r270 bottom
FB11 "BLM18KG221BH1D" BEADC160X80X95L40 235.989,17.281 r0 bottom
FB12 "BLM18KG221BH1D" BEADC160X80X95L40 24.851,14.915 r180 bottom
FB13 "BLM18KG221BH1D" BEADC160X80X95L40 107.475,15.911 r0 bottom
FB14 "BLM18KG221BH1D" BEADC160X80X95L40 165.585,16.749 r180 top
FB15 "BLM18KG221BH1D" BEADC160X80X95L40 156.179,5.791 r90 top
FB16 "BLM18KG221BH1D" BEADC160X80X95L40 37.399,6.33 r180 bottom
FB17 "BLM18KG221BH1D" BEADC160X80X95L40 24.92,6.313 r180 bottom
FB18 "BLM18KG221BH1D" BEADC160X80X95L40 37.717,15.466 r180 bottom
FB19 "BLM18KG221BH1D" BEADC160X80X95L40 50.637,15.147 r180 bottom
J1 "TC2050_NL" CONN__TAG_TC2050-IDC-NL 151.637,2.777 r0 bottom
J2 "PR20B04VBNN" M50-3530442 175.755,1.015 r0 top
J3 "PR20B04VBNN" M50-3530442 12.8,18.1 r0 top
J4 "PR20B04VBNN" M50-3530442 38.681,1.015 r0 top
J5 "PR20B04VBNN" M50-3530442 25.438,1.015 r0 top
J6 "PR20B04VBNN" M50-3530442 27.645,18.1 r0 top
J7 "PR20B04VBNN" M50-3530442 54.7,18.1 r0 top
L1 "2 Line Common Mode Choke" DLW21HN900SQ2L 164,16.44 r180 bottom
L2 "SRP4020TA-220M" BOURNS_SRP4020TA 208.039,2.878 r180 top
L3 "SRR4828A-180M" IND_SRR4828A180M 228.062,3.389 r90 top
L4 "SRP4020TA-8R2M" BOURNS_SRP4020TA 213.562,10.243 r90 top
L5 "DFE2HCAH1R5MJ0L" IND_DFE2HCAH1R0MJ0L 165.029,8.895 r180 top
L6 "DFE2HCAH1R0MJ0L" INDC250X200X120L60 158.481,4.663 r180 top
Q1 "TPW3R70APL,L1Q" TOSHIBA_2-5Q1A 276.809,15.402 r90 top
Q2 "TPW3R70APL,L1Q" TOSHIBA_2-5Q1A 275.627,15.602 r90 bottom
Q3 "TPW3R70APL,L1Q" TOSHIBA_2-5Q1A 276.809,9.467 r90 top
Q4 "TPW3R70APL,L1Q" TOSHIBA_2-5Q1A 275.627,9.332 r90 bottom
Q5 "TPW3R70APL,L1Q" TOSHIBA_2-5Q1A 276.809,3.442 r90 top
Q6 "TPW3R70APL,L1Q" TOSHIBA_2-5Q1A 275.608,3.476 r90 bottom
Q7 "BSP129H6327XTSA1" SOT230P700X180-4N 174.573,5.71 r180 bottom
Q8 "SQJ185ELP-T1_GE3" "POWERPAK SO-8L_VIS" 258.168,11.219 r180 top
R1 "RC0402FR-0722RL" RESC100X50X40L25 146.944,1.256 r180 bottom
R2 "RC0402FR-071ML" RESC100X50X40L25 148.357,13.077 r90 top
R3 "RC0402FR-0722RL" RESC100X50X40L25 146.933,2.343 r180 bottom
R4 "DNP chip res 0603" RESC160X80X55L30 146.995,9.473 r0 top
R5 "RC0402FR-0710KL" RESC100X50X40L25 144.504,10.887 r90 bottom
R6 "RC0402FR-070RL" RESC100X50X40L25 215.767,4.199 r270 top
R7 "RC0402FR-070RL" RESC100X50X40L25 226.522,12.161 r0 top
R8 "RC0402FR-070RL" RESC100X50X40L25 220.757,9.67 r270 top
R9 "RC0402FR-070RL" RESC100X50X40L25 170.54,8.251 r180 top
R10 "RC0402FR-0747K5L" RESC100X50X40L25 88.341,3.968 r90 bottom
R11 "RC0402FR-0747K5L" RESC100X50X40L25 85.821,6.037 r90 bottom
R12 "RC0402FR-0747K5L" RESC100X50X40L25 89.341,7.037 r90 bottom
R13 "RC0402FR-0747K5L" RESC100X50X40L25 88.341,7.037 r90 bottom
R14 "RC0402FR-0747K5L" RESC100X50X40L25 88.321,12.51 r90 bottom
R15 "RC0402FR-0747K5L" RESC100X50X40L25 85.821,14.537 r90 bottom
R16 "RC0402FR-0747K5L" RESC100X50X40L25 89.321,15.537 r90 bottom
R17 "RC0402FR-0747K5L" RESC100X50X40L25 88.321,15.537 r90 bottom
R18 "RC0402FR-0722RL" RESC100X50X40L25 86.871,3.417 r0 bottom
R19 "RC0402FR-0722RL" RESC100X50X40L25 85.679,11.917 r0 bottom
R20 "RC0402FR-0722RL" RESC100X50X40L25 90.817,5.564 r180 bottom
R21 "RC0402FR-0722RL" RESC100X50X40L25 90.821,14.112 r180 bottom
R22 "RC0402FR-0722RL" RESC100X50X40L25 90.827,4.498 r180 bottom
R23 "RC0402FR-0722RL" RESC100X50X40L25 90.821,13.112 r180 bottom
R24 "RC0402FR-0747K5L" RESC100X50X40L25 78.321,4.037 r90 bottom
R25 "RC0402FR-0747K5L" RESC100X50X40L25 75.821,6.037 r90 bottom
R26 "RC0402FR-0747K5L" RESC100X50X40L25 79.321,7.037 r90 bottom
R27 "RC0402FR-0747K5L" RESC100X50X40L25 78.321,7.037 r90 bottom
R28 "RC0402FR-0747K5L" RESC100X50X40L25 78.321,12.537 r90 bottom
R29 "RC0402FR-0747K5L" RESC100X50X40L25 75.821,14.537 r90 bottom
R30 "RC0402FR-0747K5L" RESC100X50X40L25 79.321,15.537 r90 bottom
R31 "RC0402FR-0747K5L" RESC100X50X40L25 78.317,15.519 r90 bottom
R32 "RC0402FR-0747K5L" RESC100X50X40L25 54.833,3.529 r180 bottom
R33 "RC0402FR-0747K5L" RESC100X50X40L25 62.804,4.508 r0 bottom
R34 "RC0402FR-0722RL" RESC100X50X40L25 76.871,3.417 r0 bottom
R35 "RC0402FR-0722RL" RESC100X50X40L25 76.821,12.037 r0 bottom
R36 "RC0402FR-0747K5L" RESC100X50X40L25 62.804,5.587 r180 bottom
R37 "RC0402FR-0722RL" RESC100X50X40L25 80.821,5.597 r180 bottom
R38 "RC0402FR-0722RL" RESC100X50X40L25 80.821,14.037 r180 bottom
R39 "RC0402FR-0722RL" RESC100X50X40L25 80.813,4.556 r180 bottom
R40 "RC0402FR-0722RL" RESC100X50X40L25 80.821,12.987 r180 bottom
R41 "RC0402FR-0747K5L" RESC100X50X40L25 68.371,3.921 r90 bottom
R42 "RC0402FR-0747K5L" RESC100X50X40L25 65.821,6.037 r90 bottom
R43 "RC0402FR-0747K5L" RESC100X50X40L25 69.371,7.037 r90 bottom
R44 "RC0402FR-0747K5L" RESC100X50X40L25 68.371,7.037 r90 bottom
R45 "RC0402FR-0747K5L" RESC100X50X40L25 68.321,12.517 r90 bottom
R46 "RC0402FR-0747K5L" RESC100X50X40L25 65.821,14.537 r90 bottom
R47 "RC0402FR-0747K5L" RESC100X50X40L25 69.321,15.537 r90 bottom
R48 "RC0402FR-0747K5L" RESC100X50X40L25 68.321,15.537 r90 bottom
R49 "RC0402FR-0747K5L" RESC100X50X40L25 102.159,15.915 r270 bottom
R50 "RC0402FR-0722RL" RESC100X50X40L25 66.794,3.417 r0 bottom
R51 "RC0402FR-0722RL" RESC100X50X40L25 66.721,11.917 r0 bottom
R52 "RC0402FR-0722RL" RESC100X50X40L25 70.821,5.538 r180 bottom
R53 "RC0402FR-0722RL" RESC100X50X40L25 70.821,14.087 r180 bottom
R54 "RC0402FR-0722RL" RESC100X50X40L25 70.821,4.508 r180 bottom
R55 "RC0402FR-0722RL" RESC100X50X40L25 70.821,13.097 r180 bottom
R56 "RC0402FR-0747K5L" RESC100X50X40L25 58.309,3.974 r90 bottom
R57 "RC0402FR-0747K5L" RESC100X50X40L25 55.821,6.037 r90 bottom
R58 "RC0402FR-0747K5L" RESC100X50X40L25 59.321,7.087 r90 bottom
R59 "RC0402FR-0747K5L" RESC100X50X40L25 58.325,7.087 r90 bottom
R60 "RC0402FR-0747K5L" RESC100X50X40L25 58.332,12.537 r90 bottom
R61 "RC0402FR-0747K5L" RESC100X50X40L25 55.821,14.537 r90 bottom
R62 "RC0402FR-0747K5L" RESC100X50X40L25 59.321,15.537 r90 bottom
R63 "RC0402FR-0747K5L" RESC100X50X40L25 58.318,15.518 r90 bottom
R64 "RC0402FR-0722RL" RESC100X50X40L25 56.821,3.529 r0 bottom
R65 "RC0402FR-0722RL" RESC100X50X40L25 56.804,11.986 r0 bottom
R66 "RC0402FR-0722RL" RESC100X50X40L25 60.821,5.607 r180 bottom
R67 "RC0402FR-0722RL" RESC100X50X40L25 60.957,14.038 r180 bottom
R68 "RC0402FR-0722RL" RESC100X50X40L25 60.821,4.474 r180 bottom
R69 "RC0402FR-0722RL" RESC100X50X40L25 60.934,12.967 r180 bottom
R70 "RC0603FR-070RL" RESC160X80X55L30 179.525,12.666 r0 bottom
R71 "RC0402FR-0710KL" RESC100X50X40L25 175.503,3.937 r90 top
R72 "RC0402FR-0710KL" RESC100X50X40L25 16.585,17.906 r0 top
R73 "RC0402FR-0710KL" RESC100X50X40L25 40.846,4.53 r180 top
R74 "RC0402FR-0710KL" RESC100X50X40L25 23.983,2.92 r0 bottom
R75 "RC0603FR-070RL" RESC160X80X55L30 259.864,1.108 r180 bottom
R76 "RC0603FR-070RL" RESC160X80X55L30 260.433,16.906 r90 top
R77 "RC0603FR-070RL" RESC160X80X55L30 260.645,15.505 r90 bottom
R78 "RC0402FR-0710KL" RESC100X50X40L25 27.462,16.515 r0 bottom
R79 "RC0402FR-0747K5L" RESC100X50X40L25 99.334,5.545 r180 bottom
R80 "RC0402FR-0747K5L" RESC100X50X40L25 96.195,3.265 r0 bottom
R81 "RC0402FR-0747K5L" RESC100X50X40L25 96.159,5.444 r0 bottom
R82 "RC0402FR-0747K5L" RESC100X50X40L25 99.334,4.545 r180 bottom
R83 "RC0402FR-0747K5L" RESC100X50X40L25 96.156,6.423 r0 bottom
R84 "RC0402FR-0722RL" RESC100X50X40L25 96.156,7.512 r180 bottom
R85 "RC0402FR-0722RL" RESC100X50X40L25 99.334,3.545 r0 bottom
R86 "RC0402FR-0722RL" RESC100X50X40L25 99.321,2.537 r0 bottom
R87 "RC0402FR-0722RL" RESC100X50X40L25 96.157,4.36 r180 bottom
R88 "RC0402FR-0747K5L" RESC100X50X40L25 100.863,2.012 r90 bottom
R89 "RC0402FR-0710KL" RESC100X50X40L25 53.883,11.938 r180 bottom
R90 "RC0402FR-0747K5L" RESC100X50X40L25 159.236,16.309 r0 top
R91 "RC0402FR-0747K5L" RESC100X50X40L25 159.679,11.728 r180 top
R92 "RC0402FR-0722RL" RESC100X50X40L25 157.272,16.301 r0 top
R93 "RC0402FR-0722RL" RESC100X50X40L25 156.102,12.722 r0 top
R94 "RC0402FR-0722RL" RESC100X50X40L25 161.029,11.083 r90 top
R95 "RC0402FR-075R1L" RESC100X50X40L25 114.092,6.549 r270 bottom
R96 "RC0402FR-0747K5L" RESC100X50X40L25 104.871,4.037 r180 bottom
R97 "RC0402FR-0747K5L" RESC100X50X40L25 104.871,2.917 r180 bottom
R98 "RC0402FR-0747K5L" RESC100X50X40L25 109.839,2.917 r180 bottom
R99 "RC0402FR-0722RL" RESC100X50X40L25 107.134,4.037 r180 bottom
R100 "RC0402FR-0722RL" RESC100X50X40L25 112.371,4.037 r0 bottom
R101 "RC0402FR-0722RL" RESC100X50X40L25 107.134,2.917 r180 bottom
R102 "RC0402FR-0722RL" RESC100X50X40L25 112.369,2.908 r0 bottom
R103 "RC0402FR-0747K5L" RESC100X50X40L25 109.821,4.037 r0 bottom
R105 "RC0402FR-0747K5L" RESC100X50X40L25 117.653,11.335 r270 top
R106 "RC0402FR-0747K5L" RESC100X50X40L25 116.653,11.335 r270 top
R107 "RC0402FR-0722RL" RESC100X50X40L25 114.292,15.056 r0 bottom
R108 "RC0402FR-0722RL" RESC100X50X40L25 114.342,14.056 r0 bottom
R109 "RC0402FR-0722RL" RESC100X50X40L25 115.653,11.335 r90 top
R110 "RC0402FR-0722RL" RESC100X50X40L25 118.653,11.335 r90 top
R111 "RC0402FR-0747K5L" RESC100X50X40L25 114.342,13.056 r0 bottom
R112 "RC0402FR-0747K5L" RESC100X50X40L25 114.653,11.335 r90 top
R114 "RC0402FR-0722RL" RESC100X50X40L25 262.821,12.523 r180 bottom
R115 "RC0402FR-0722RL" RESC100X50X40L25 262.858,13.6 r0 bottom
R116 "RC0603FR-070RL" RESC160X80X55L30 280.701,17.404 r180 bottom
R117 "RC0402FR-0722RL" RESC100X50X40L25 262.67,17.204 r0 bottom
R118 "RC0603FR-070RL" RESC160X80X55L30 270.144,16.999 r0 bottom
R119 "RC0402FR-0722RL" RESC100X50X40L25 262.86,6.938 r0 bottom
R120 "RC0402FR-0722RL" RESC100X50X40L25 262.851,7.925 r0 bottom
R121 "RC0603FR-070RL" RESC160X80X55L30 280.701,12.13 r180 bottom
R122 "RC0402FR-0722RL" RESC100X50X40L25 262.822,11.585 r0 bottom
R123 "RC0603FR-070RL" RESC160X80X55L30 269.817,10.955 r0 bottom
R124 "RC0402FR-0722RL" RESC100X50X40L25 262.879,1.201 r0 bottom
R125 "RC0402FR-0722RL" RESC100X50X40L25 262.869,2.234 r0 bottom
R126 "RC0603FR-070RL" RESC160X80X55L30 280.765,5.982 r180 bottom
R127 "RC0402FR-0722RL" RESC100X50X40L25 262.851,5.741 r0 bottom
R128 "RC0603FR-070RL" RESC160X80X55L30 269.843,5.292 r0 bottom
R129 "CRA2512-FZ-R020ELF" RC_CRA2512_BOURNS 284.84,16.006 r0 top
R130 "RC0402FR-07100KL" RESC100X50X40L25 247.809,14.617 r0 top
R131 "RC0402FR-07100KL" RESC100X50X40L25 245.283,16.473 r0 top
R132 "RC0402FR-074K22L" RESC100X50X40L25 245.352,15.044 r270 top
R133 "RC0402FR-074K22L" RESC100X50X40L25 243.836,17.483 r270 top
R134 "RC0603FR-070RL" RESC160X80X55L30 249.494,15.28 r270 top
R135 "RC0603FR-070RL" RESC160X80X55L30 250.916,15.287 r270 top
R136 "RC0603FR-070RL" RESC160X80X55L30 245.429,16.297 r0 bottom
R137 "RC0402FR-0754K9L" RESC100X50X40L25 239.58,17.423 r0 top
R138 "RC0402FR-07274KL" RESC100X50X40L25 236.294,16.134 r0 top
R139 "CRA2512-FZ-R020ELF" RC_CRA2512_BOURNS 284.84,9.506 r0 top
R140 "RC0402FR-07100KL" RESC100X50X40L25 247.99,8.697 r0 top
R141 "RC0402FR-07332KL" RESC100X50X40L25 241.471,14.702 r270 top
R142 "RC0402FR-074K22L" RESC100X50X40L25 246.218,9.602 r0 top
R143 "RC0603FR-070RL" RESC160X80X55L30 249.782,9.432 r270 top
R144 "RC0603FR-070RL" RESC160X80X55L30 251.13,9.452 r270 top
R145 "RC0402FR-0710KL" RESC100X50X40L25 241.998,16.243 r180 top
R146 "RC0402FR-0722RL" RESC100X50X40L25 243.544,14.635 r90 top
R147 "RC0603FR-070RL" RESC160X80X55L30 245.264,9.993 r0 bottom
R148 "RC0402FR-07332KL" RESC100X50X40L25 242.472,7.413 r270 top
R149 "CRA2512-FZ-R020ELF" RC_CRA2512_BOURNS 284.84,3.364 r0 top
R150 "RC0402FR-07100KL" RESC100X50X40L25 247.918,2.859 r0 top
R151 "RC0402FR-0710KL" RESC100X50X40L25 243,8.898 r180 top
R152 "RC0402FR-0722RL" RESC100X50X40L25 244.859,7.45 r180 bottom
R153 "RC0402FR-074K22L" RESC100X50X40L25 246.047,2.859 r0 top
R154 "RC0603FR-070RL" RESC160X80X55L30 249.729,3.59 r270 top
R155 "RC0603FR-070RL" RESC160X80X55L30 251.043,3.569 r270 top
R156 "RC0402FR-07332KL" RESC100X50X40L25 242.563,2.973 r270 top
R157 "RC0603FR-070RL" RESC160X80X55L30 245.3,4.377 r0 bottom
R158 "RC0402FR-0710KL" RESC100X50X40L25 243.091,4.501 r180 top
R159 "RC0402FR-0722RL" RESC100X50X40L25 244.987,1.458 r180 bottom
R160 "RC0603FR-070RL" RESC160X80X55L30 252.261,1.364 r0 top
R161 "RC0402FR-07510KL" RESC100X50X40L25 191.418,16.715 r270 top
R162 "RC0402FR-0731K6L" RESC100X50X40L25 190.982,18.086 r180 top
R163 "RC0603FR-070RL" RESC160X80X55L30 183.401,3.559 r180 bottom
R164 "RC0402FR-0731K6L" RESC100X50X40L25 190.307,12.134 r0 top
R165 "RC0402FR-07110RL" RESC100X50X40L25 184.885,12.124 r180 bottom
R166 "DNP chip res 0603" RESC160X80X55L30 179.401,15.891 r270 top
R167 "RC0402FR-07510KL" RESC100X50X40L25 181.646,13.993 r270 top
R168 "RC0402FR-0747K5L" RESC100X50X40L25 175.954,5.285 r0 top
R169 "DNP chip res 0603" RESC160X80X55L30 179.342,17.19 r90 bottom
R170 "DNP chip res 0603" RESC160X80X55L30 180.57,17.089 r270 top
R171 "RC0402FR-0722RL" RESC100X50X40L25 175.978,6.349 r180 top
R172 "RC0402FR-0722RL" RESC100X50X40L25 175.978,7.282 r180 top
R173 "RC0402FR-0722RL" RESC100X50X40L25 175.981,8.289 r180 top
R174 "RC0402FR-0722RL" RESC100X50X40L25 175.961,9.23 r180 top
R175 "RC0603FR-070RL" RESC160X80X55L30 183.007,8.379 r270 bottom
R176 "DNP chip res 0603" RESC160X80X55L30 189.822,2.165 r0 top
R177 "RC0402FR-0743KL" RESC100X50X40L25 190.111,1.116 r180 top
R179 "RC0402FR-0743KL" RESC100X50X40L25 189.608,4.354 r180 top
R180 "RC0402FR-0710KL" RESC100X50X40L25 181.148,15.387 r180 top
R181 "DNP chip res 0603" RESC160X80X55L30 189.83,3.326 r0 top
R182 "RC0402FR-0710KL" RESC100X50X40L25 182.869,14.832 r90 bottom
R183 "DNP chip res 0603" RESC160X80X55L30 189.834,6.37 r0 top
R184 "RC0402FR-0743KL" RESC100X50X40L25 189.635,5.304 r180 top
R185 "RC0402FR-0743KL" RESC100X50X40L25 189.571,8.656 r180 top
R186 "DNP chip res 0603" RESC160X80X55L30 189.827,7.591 r0 top
R187 "RC0603FR-070RL" RESC160X80X55L30 24.832,16.274 r0 bottom
R188 "RC0402FR-0747K5L" RESC100X50X40L25 26.185,12.91 r0 top
R189 "RC0402FR-0722RL" RESC100X50X40L25 26.185,11.949 r0 top
R190 "RC0402FR-0710KL" RESC100X50X40L25 16.56,11.958 r0 top
R191 "RC0402FR-0722RL" RESC100X50X40L25 26.185,10.949 r0 top
R192 "RC0402FR-0710KL" RESC100X50X40L25 16.56,13.958 r0 top
R193 "RC0402FR-0722RL" RESC100X50X40L25 26.185,16.262 r0 top
R194 "RC0402FR-0722RL" RESC100X50X40L25 26.185,15.262 r0 top
R195 "DNP chip res 0603" RESC160X80X55L30 20.903,10.241 r180 top
R196 "RC0402FR-07110RL" RESC100X50X40L25 19.888,16.897 r270 bottom
R198 "RC0402FR-0747K5L" RESC100X50X40L25 107.688,13.572 r0 bottom
R199 "RC0402FR-0722RL" RESC100X50X40L25 111.855,12.717 r0 bottom
R200 "RC0402FR-0722RL" RESC100X50X40L25 111.87,11.627 r0 bottom
R201 "RC0603FR-070RL" RESC160X80X55L30 172.252,8.379 r270 top
R202 "RC0402FR-0722RL" RESC100X50X40L25 161.003,16.961 r180 bottom
R203 "RC0402FR-0722RL" RESC100X50X40L25 160.999,15.973 r180 bottom
R204 "RC0402FR-0749K9L" RESC100X50X40L25 167.543,13.062 r90 bottom
R205 "RC0402FR-07110RL" RESC100X50X40L25 166.549,13.062 r90 bottom
R206 "RC0402FR-07100KL" RESC100X50X40L25 164.599,14.727 r0 bottom
R207 "RC0402FR-070RL" RESC100X50X40L25 116.295,2.908 r180 top
R208 "RC0402FR-0722RL" RESC100X50X40L25 256.141,15.851 r270 top
R209 "RC0402FR-07100KL" RESC100X50X40L25 258.963,18.088 r180 top
R210 "RC0402FR-070RL" RESC100X50X40L25 160.835,9.021 r90 top
R212 "RC0402FR-07100KL" RESC100X50X40L25 216.792,1.931 r270 top
R213 "RC0402FR-07100KL" RESC100X50X40L25 230.384,9.541 r270 top
R214 "ERJ-2RKF5621X" RC0402N_PAN 215.825,1.897 r90 top
R215 "ERJ-2RKF7151X" RC0402N_PAN 229.42,9.541 r90 top
R216 "RC0402FR-0722RL" RESC100X50X40L25 131.631,5.837 r270 bottom
R218 "RN73H1ETTP1353F50" RESC100X50X40L25 169.201,10.716 r180 top
R219 "RC0402FR-07100KL" RESC100X50X40L25 218.45,6.882 r180 top
R220 "RC0402FR-0730KL" RESC100X50X40L25 170.529,9.192 r180 top
R221 "RC0402FR-071K91L" RESC100X50X40L25 220.343,6.857 r180 top
R222 "RC0402FR-07178KL" RESC100X50X40L25 158.224,6.512 r180 top
R223 "RC0402FR-07100KL" RESC100X50X40L25 125.916,8.704 r90 top
R224 "RC0402FR-0756RL" RESC100X50X40L25 125.896,6.852 r270 top
R225 "RMCF0402FT39K2" RESC100X50X40L25 156.745,10.692 r0 top
R226 "RC0402FR-0764K9L" RESC100X50X40L25 157.324,8.876 r270 top
R227 "RC0402FR-07100KL" RESC100X50X40L25 125.889,4.026 r90 top
R228 "RC0402FR-0756RL" RESC100X50X40L25 125.889,2.152 r270 top
R229 "RC0603FR-070RL" RESC160X80X55L30 37.381,7.65 r0 bottom
R230 "RC0402FR-0747K5L" RESC100X50X40L25 39.034,4.515 r0 top
R231 "RC0402FR-0722RL" RESC100X50X40L25 39.031,3.594 r0 top
R232 "RC0402FR-0710KL" RESC100X50X40L25 29.188,2.712 r0 top
R233 "RC0402FR-0722RL" RESC100X50X40L25 39.04,2.693 r0 top
R234 "RC0402FR-0710KL" RESC100X50X40L25 29.188,4.667 r0 top
R235 "RC0402FR-0722RL" RESC100X50X40L25 39.058,7.21 r0 top
R236 "RC0402FR-0722RL" RESC100X50X40L25 39.058,6.21 r0 top
R237 "DNP chip res 0603" RESC160X80X55L30 33.725,1.401 r180 top
R238 "RC0402FR-07110RL" RESC100X50X40L25 32.38,8.18 r270 bottom
R239 "RC0603FR-070RL" RESC160X80X55L30 259.901,2.285 r180 bottom
R240 "RC0603FR-070RL" RESC160X80X55L30 125.69,10.149 r180 bottom
R241 "RC0402FR-0722RL" RESC100X50X40L25 128.249,2.016 r90 bottom
R242 "RC0603FR-070RL" RESC160X80X55L30 234.874,11.285 r180 top
R244 "RC0603FR-070RL" RESC160X80X55L30 24.92,7.657 r0 bottom
R245 "RC0402FR-0747K5L" RESC100X50X40L25 26.196,3.638 r0 top
R246 "RC0402FR-0722RL" RESC100X50X40L25 26.202,4.588 r0 top
R247 "RC0402FR-0710KL" RESC100X50X40L25 16.558,2.533 r0 top
R248 "RC0402FR-0722RL" RESC100X50X40L25 26.196,2.669 r0 top
R249 "RC0402FR-0710KL" RESC100X50X40L25 16.558,3.533 r0 top
R250 "RC0402FR-0722RL" RESC100X50X40L25 26.185,7.616 r0 top
R251 "RC0402FR-0722RL" RESC100X50X40L25 26.185,6.616 r0 top
R252 "DNP chip res 0603" RESC160X80X55L30 21.19,1.383 r180 top
R253 "RC0402FR-07110RL" RESC100X50X40L25 19.82,7.93 r270 bottom
R254 "RC0603FR-070RL" RESC160X80X55L30 37.717,16.638 r0 bottom
R255 "RC0402FR-0747K5L" RESC100X50X40L25 38.916,12.096 r0 top
R256 "RC0402FR-0722RL" RESC100X50X40L25 38.921,13.086 r0 top
R257 "RC0402FR-0710KL" RESC100X50X40L25 29.153,11.427 r0 top
R258 "RC0402FR-0722RL" RESC100X50X40L25 38.938,11.093 r0 top
R259 "RC0402FR-0710KL" RESC100X50X40L25 29.14,13.328 r0 top
R260 "RC0402FR-0722RL" RESC100X50X40L25 38.921,16.571 r0 top
R261 "RC0402FR-0722RL" RESC100X50X40L25 38.921,15.571 r0 top
R262 "DNP chip res 0603" RESC160X80X55L30 33.64,10.241 r180 top
R263 "RC0402FR-07110RL" RESC100X50X40L25 32.381,16.844 r270 bottom
R264 "RC0603FR-070RL" RESC160X80X55L30 50.63,16.515 r0 bottom
R265 "RC0402FR-0747K5L" RESC100X50X40L25 52.231,11.926 r0 top
R266 "RC0402FR-0722RL" RESC100X50X40L25 52.221,12.979 r0 top
R267 "RC0402FR-0710KL" RESC100X50X40L25 42.218,11.449 r0 top
R268 "RC0402FR-0722RL" RESC100X50X40L25 52.258,10.912 r0 top
R269 "RC0402FR-0710KL" RESC100X50X40L25 42.218,12.469 r0 top
R270 "RC0402FR-0722RL" RESC100X50X40L25 52.223,15.588 r0 top
R271 "RC0402FR-0722RL" RESC100X50X40L25 52.239,14.652 r0 top
R272 "DNP chip res 0603" RESC160X80X55L30 47.13,10.125 r180 top
R273 "RC0402FR-07110RL" RESC100X50X40L25 45.559,17.041 r270 bottom
R275 "RC0402FR-0722RL" RESC100X50X40L25 128.446,5.492 r0 bottom
R277 "RC0402FR-0722RL" RESC100X50X40L25 129.207,2.027 r90 bottom
R286 "RC0603FR-070RL" RESC160X80X55L30 260.711,10.722 r270 bottom
R287 "RC0603FR-070RL" RESC160X80X55L30 260.786,4.15 r270 bottom
R288 "RC0603FR-070RL" RESC160X80X55L30 218.797,16.832 r270 top
R290 "RC0603FR-070RL" RESC160X80X55L30 190.063,12.967 r0 bottom
R291 "RC0402FR-07110RL" RESC100X50X40L25 121.714,12.58 r270 top
R292 "RC0402FR-0722RL" RESC100X50X40L25 146.949,3.405 r180 bottom
R293 "RC0402FR-0722RL" RESC100X50X40L25 149.02,2.873 r180 bottom
R294 "RC0402FR-0722RL" RESC100X50X40L25 149.028,1.774 r180 bottom
TP1 "Test Point" TP_D1.5mm 138.5,18.227 r180 bottom
TP2 "Test Point" TP_D1.5mm 100.598,15.437 r90 bottom
TP3 "Test Point" TP_D0.75mm 149.637,4.087 r90 bottom
TP4 "Test Point" TP_D0.75mm 268.59,12.996 r0 bottom
TP5 "Test Point" TP_D0.75mm 268.762,7.031 r0 bottom
TP6 "Test Point" TP_D0.75mm 261.534,6.71 r270 bottom
TP7 "Test Point" TP_D0.75mm 268.475,1.207 r0 bottom
TP8 "Test Point" TP_D0.75mm 244.431,14.178 r270 bottom